# Altium PCB A4_USB.PcbDoc
Units mil, origin at the board's own origin, x right, y up, seen from the top; angles counter-clockwise.
Board outline 4763.78 x 2346.46 mil, 2 copper layers (Top Layer, Bottom Layer), stack 61.855 mil thick; 16 components, 33 nets, 94 pads, 65 vias.
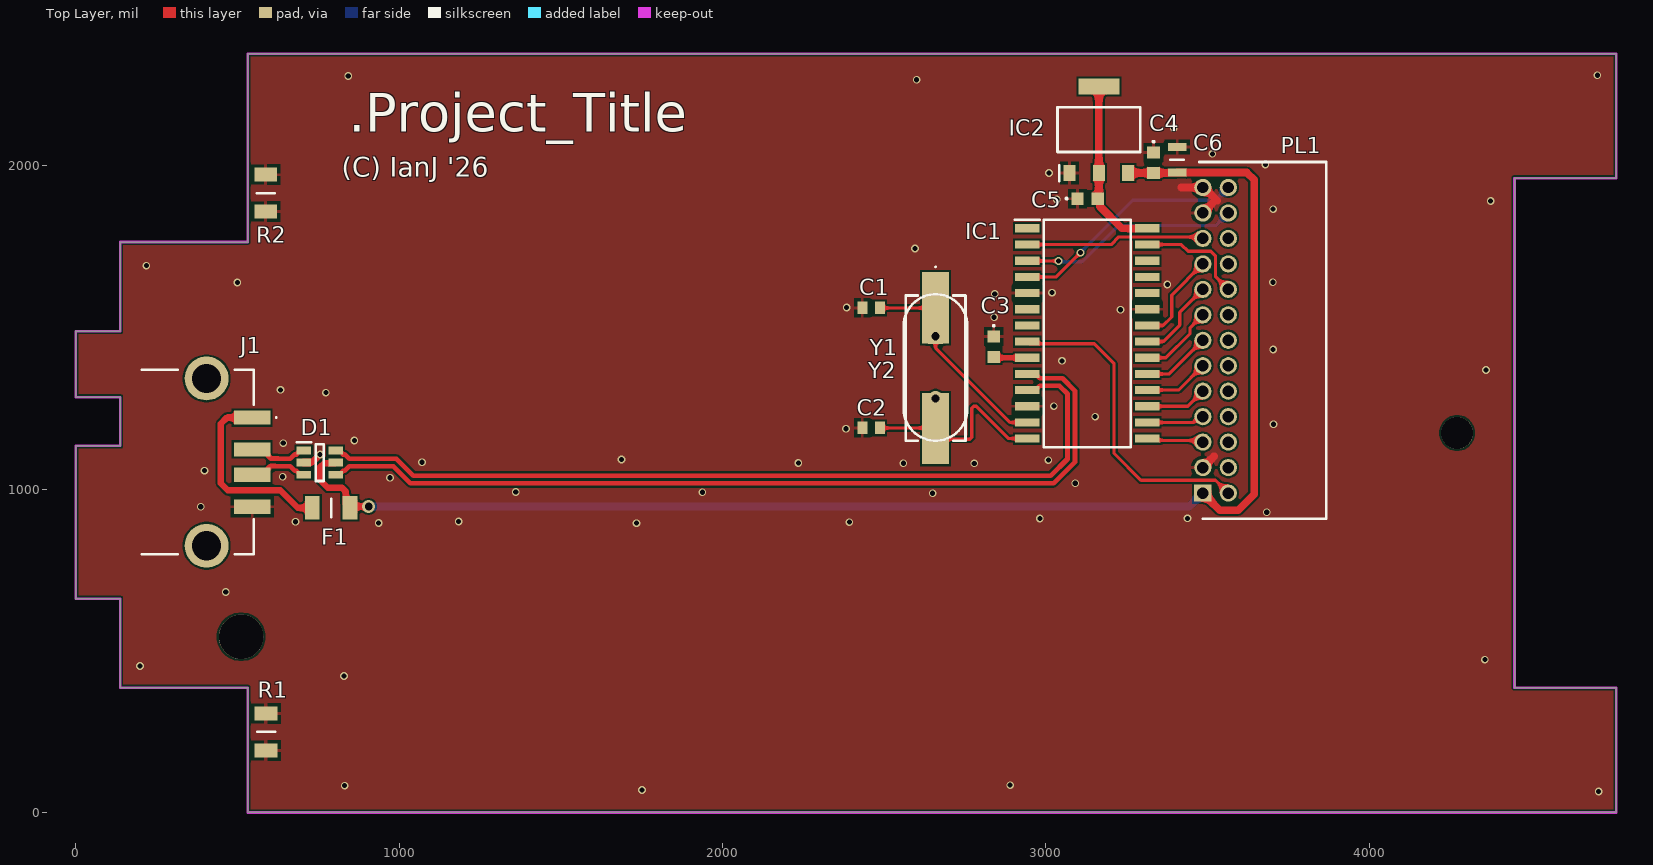
[diagram p0: Top Layer view]
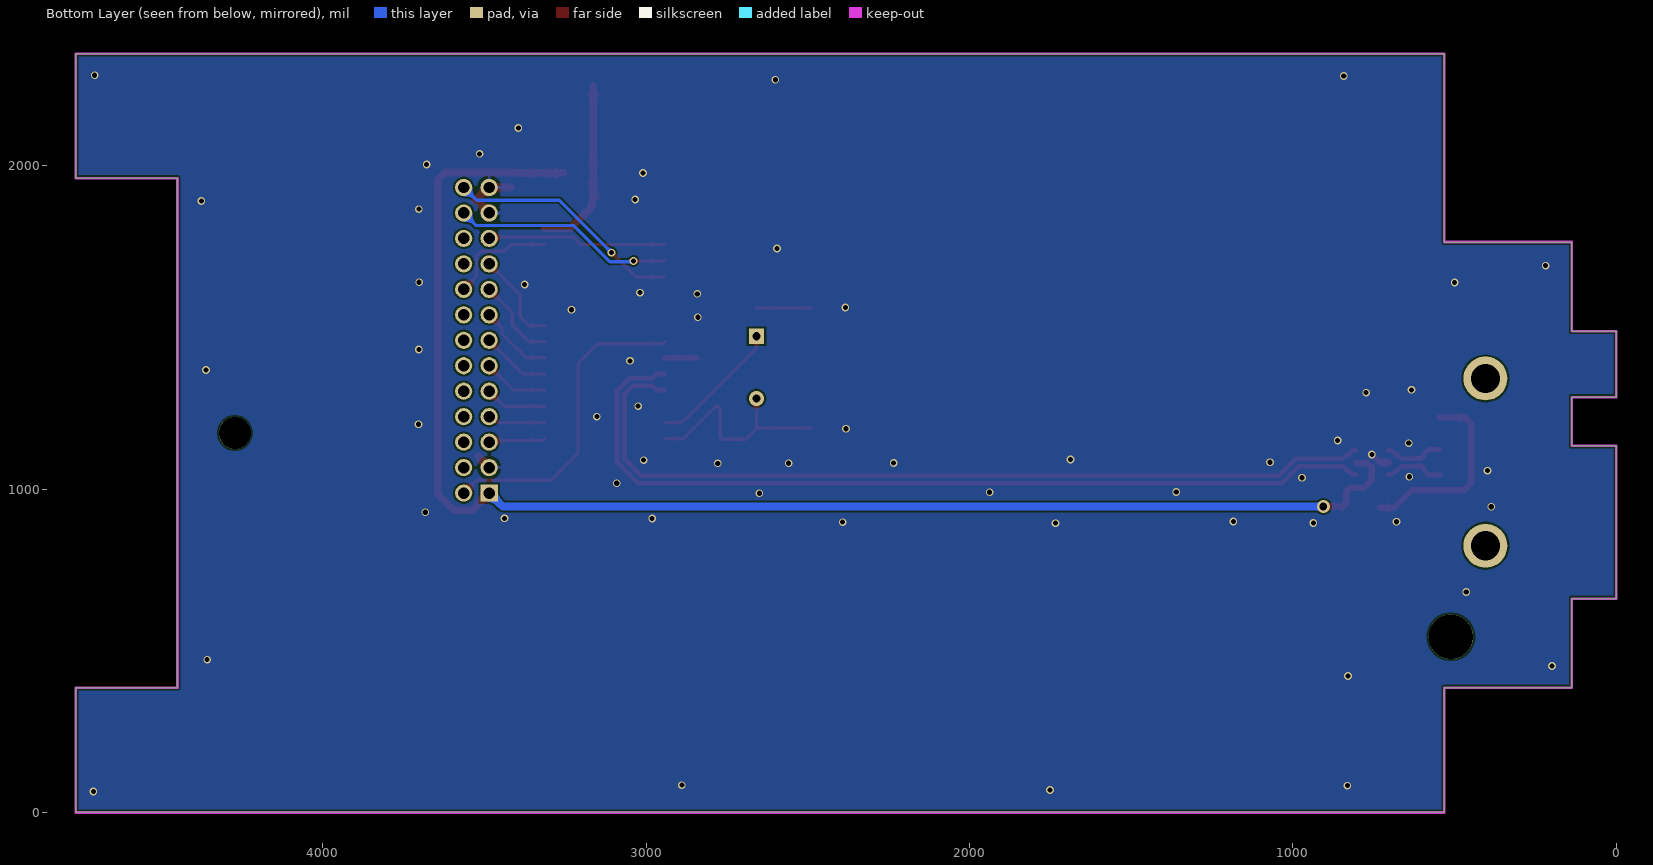
[diagram p1: Bottom Layer view, seen from below]
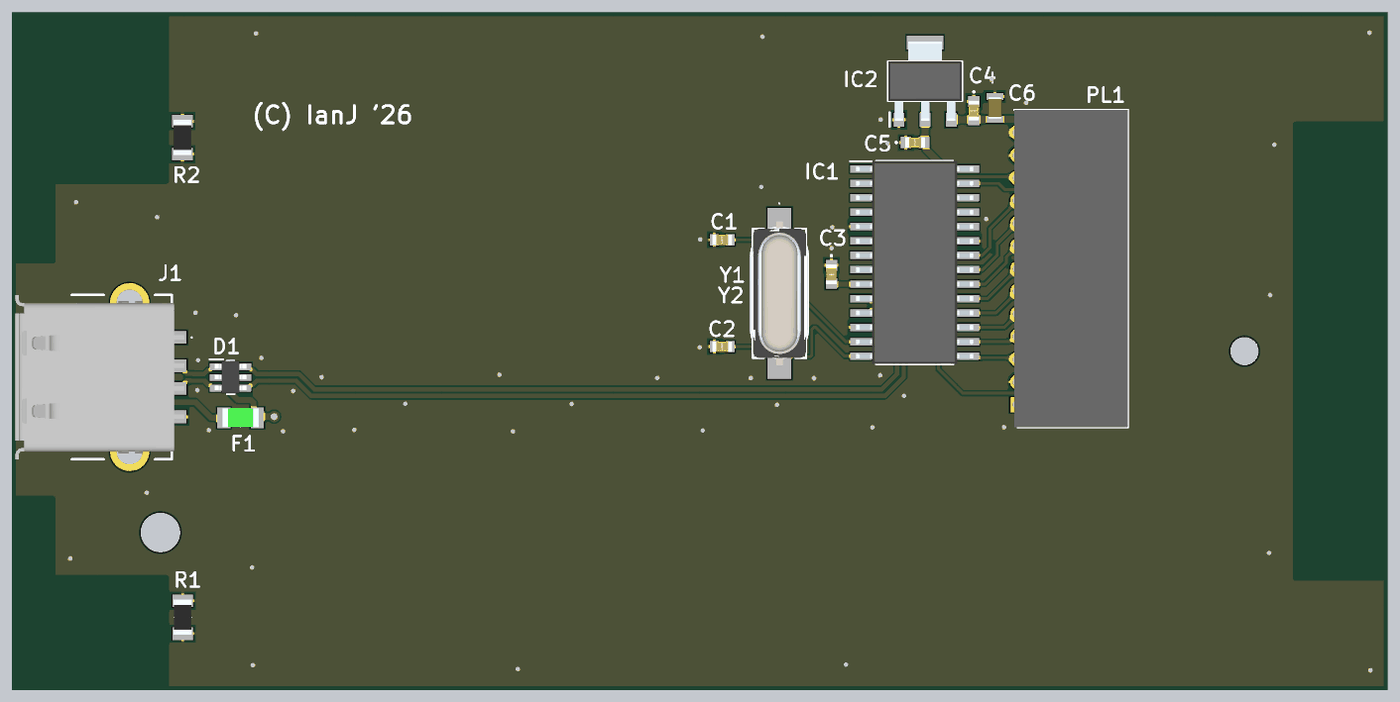
[diagram p2: 3D render of the assembled board from above, using the file's embedded part models]

## Layer stack, top to bottom
Top Solder: solder mask 0.4, Solder Resist, Dk 3.5
Top Layer: signal copper 1.4
FR4: dielectric 59.0551, FR-4, Dk 4.8
Bottom Layer: signal copper 1.4
Bottom Solder: solder mask 0.4, Solder Resist, Dk 3.5

## Board outline
138.17,385.83 138.17,661.42 0.37,661.42 0.37,1133.86 138.17,1133.86 138.17,1283.46 0.37,1283.46 0.37,1488.19 138.17,1488.19 138.17,1763.78 531.87,1763.78 531.87,2346.46 4764.15,2346.46 4764.15,1960.63 4449.19,1960.63 4449.19,385.83 4764.15,385.83 4764.15,0 531.87,0 531.87,385.83

## Design rules (kind name [scope] priority, off if disabled: settings)
Clearance [All] p1: gap=5.91 ignorepadtopadclearanceinfootprint=FALSE
DiffPairsRouting [All] p1: maxlimit=10 minlimit=8 mostfreqgap=8 toplayer_minwidth=12 toplayer_maxwidth=15 toplayer_prefwidth=12 bottomlayer_minwidth=12 bottomlayer_maxwidth=15 bottomlayer_prefwidth=12 maxuncoupledlength=500
HoleSize [All] p1: absolutevalues=TRUE maxlimit=157.48 minlimit=1 maxpercent=80.000 minpercent=20.000
MinimumSolderMaskSliver [All] p1: minsoldermaskwidth=1
PolygonConnect [All] p1: connectstyle=Relief reliefconductorwidth=10 reliefentries=4 polygonreliefangle="90 Angle" airgapwidth=10
RoutingVias [All] p1: holewidth=28 width=50 viastyle="Through Hole" minholewidth=15 minwidth=20 maxholewidth=28 maxwidth=50
SilkToSilkClearance [All] p1: silktosilkclearance=3.94
SilkToSolderMaskClearance [IsPad] p1: minsilkscreentomaskgap=3.94 clearancetoexposedcopper=TRUE
SolderMaskExpansion [All] p1: expansion=4 istentingtop=FALSE
SupplyNets "Schematic Supply Nets_6" [InNet('3V3')] p1: voltage=0.000
SupplyNets "Schematic Supply Nets_3" [InNet('GND')] p2: voltage=0.000
SupplyNets "Schematic Supply Nets" [InNet('5V')] p3: voltage=0.000
Width [All] p1: maxlimit=39.37 minlimit=10 preferedwidth=10
25 further rules are at their usual default settings.

## Classes and differential pairs
differential pair XUSBD: +XUSBD_P -XUSBD_N
differential pair USBD: +USBD_P -USBD_N

## Components (designator, comment, footprint, x,y, rotation, side; value= is the part's Value field where it differs from the comment)
C1 "22pF" CAPC1608X87N 2460,1560 r0 top
C2 "22pF" CAPC1608X87N 2460,1189 r0 top
C3 "10nF" C0603 2839,1440 r270 top
C4 "100nF" C0603 3333,2009 r270 top
C5 "100nF" C0603 3129,1898 r0 top
C6 "10uF" CAPC2012X145N 3406,2018 r270 top
D1 "82400102" SOT95P280X116-6N 755,1082 r0 top
F1 "SMD1206B050TF_15" FUSC3216X115N 790,942 r180 top
IC1 "CH376S" SOIC127P1032X264-28N 3128,1481 r0 top locked
IC2 "LM1117-3.3_MDC_NOPB" SOT230P700X180-4N 3164,2111 r90 top
J1 "87583-2010BLF" 875832010BLF 275.85,1083.28 r270 top locked
PL1 "DF11-26DP-2DS_52_" SHDRRA26W50P200_2X13_2800X1000X500P 3485.41,987.56 r270 top locked
R1 "Any 1206" RESC3116X65N 589,249 r270 top
R2 "Any 1206" RESC3116X65N 588,1915 r270 top
Y1 "12MHz" ABLS 2659,1374 r270 top
Y2 "12MHz" ABL 2659,1472 r270 top

## Footprints (in the part's own frame and the unit in brackets; to place one, negate y for a bottom-side part, rotate by r counter-clockwise, add the part's x,y. Pads: shape width x height; smd on the part's side, far side on the other; paste and mask are expansions set on the pad)
875832010BLF [mm]
  rect 1.12x2.88 smd: 1(-3.5,6.86) 2(-1,6.86) 3(1,6.86) 4(3.5,6.86)
  round 3.45 hole 2.3: MH1(-6.57,3.28) MH2(6.57,3.28)
  silkscreen extent -7.25,-1.82 7.25,8.8, body extent -7.25,-6.79 7.25,8.09, height 7.49
ABL [mm]
  rect 1.205x1.205 hole 0.657: 1(0,0)
  round 1.205 hole 0.657: 2(4.88,0)
  silkscreen extent -3.31,-2.5 8.19,2.5, body extent -3.31,-2.5 8.19,2.5, height 3.5
ABLS [mm]
  rect 5.6x2.1 smd: 1(-4.75,0) 2(4.75,0)
  silkscreen extent -8,-2.35 5.7,2.35, body extent -6.35,-2.35 6.35,2.35, height 4.2
C0603 [mm]
  rect 0.95x1 smd: 1(-0.8,0) 2(0.8,0)
  silkscreen extent -1.7,-0.05 -1.6,0.05, body extent -0.87,-0.48 0.88,0.47, height 0.87
CAPC1608X87N [mm]
  rect 0.78x0.98 smd: 1(-0.7,0) 2(0.7,0)
  body extent -0.87,-0.48 0.88,0.47, height 0.87
CAPC2012X145N [mm]
  rect 0.62x1.47 smd: 1(-1,0) 2(1,0)
  silkscreen extent 0,-0.53 0,0.53, body extent -1,-0.63 1,0.63, height 1.45
FUSC3216X115N [mm]
  rect 1.16x1.82 smd: 1(-1.475,0) 2(1.475,0)
  silkscreen extent 0,-0.72 0,0.72, body extent -1.6,-0.82 1.6,0.82, height 1.15
RESC3116X65N [mm]
  rect 1.1x1.8 smd: 1(-1.45,0) 2(1.45,0)
  silkscreen extent 0,-0.7 0,0.7, body extent -1.55,-0.8 1.55,0.8, height 0.65
SHDRRA26W50P200_2X13_2800X1000X500P [mm]
  rect 1.35x1.35 hole 0.9: 1(0,0)
  round 1.35 hole 0.9: 2(0,2) 3(-2,0) 4(-2,2) 5(-4,0) 6(-4,2) 7(-6,0) 8(-6,2) 9(-8,0) 10(-8,2) 11(-10,0) 12(-10,2) 13(-12,0) 14(-12,2) 15(-14,0) 16(-14,2) 17(-16,0) 18(-16,2) 19(-18,0) 20(-18,2) 21(-20,0) 22(-20,2) 23(-22,0) 24(-22,2) 25(-24,0) 26(-24,2)
  silkscreen extent -26,-0.3 2,9.7, body extent -26,-0.3 2,9.7, height 5
SOIC127P1032X264-28N [mm]
  rect 1.925x0.65 smd: 1(-4.712,8.255) 2(-4.712,6.985) 3(-4.712,5.715) 4(-4.712,4.445) 5(-4.712,3.175) 6(-4.712,1.905) 7(-4.712,0.635) 8(-4.712,-0.635) 9(-4.712,-1.905) 10(-4.712,-3.175) 11(-4.712,-4.445) 12(-4.712,-5.715) 13(-4.712,-6.985) 14(-4.712,-8.255) 15(4.712,-8.255) 16(4.712,-6.985) 17(4.712,-5.715) 18(4.712,-4.445) 19(4.712,-3.175) 20(4.712,-1.905) 21(4.712,-0.635) 22(4.712,0.635) 23(4.712,1.905) 24(4.712,3.175) 25(4.712,4.445) 26(4.712,5.715) 27(4.712,6.985) 28(4.712,8.255)
  silkscreen extent -5.68,-8.95 3.4,8.95, body extent -5.16,-8.95 5.16,8.95, height 2.64
SOT95P280X116-6N [mm]
  rect 1.15x0.6 smd: 1(-1.25,0.95) 2(-1.25,0) 3(-1.25,-0.95) 4(1.25,-0.95) 5(1.25,0) 6(1.25,0.95)
  silkscreen extent -1.83,-1.45 0.33,1.6, body extent -1.4,-1.42 1.4,1.48, height 1.16
SOT230P700X180-4N [mm]
  rect 1.25x0.95 smd: 1(-3.4,2.3) 2(-3.4,0) 3(-3.4,-2.3)
  rect 1.25x3.2 smd: 4(3.4,0)
  silkscreen extent -4.03,-3.25 1.75,3.25, body extent -3.5,-3.25 3.5,3.25, height 1.8

## Part data
C1 C2: library part C0603C220J1GACTU, "Capacitor", Manufacturer_Name="Yageo Group", Mouser Part Number=80-C0603C220J1G, Arrow Part Number=C0603C220J1GACTU, Arrow Price/Stock=https://www.arrow.com/en/products/c0603c220j1gactu/kemet-corporation, Datasheet Link=https://www.yageogroup.com/content/datasheet/asset/file/KEM_C1003_C0G_SMD, Height=0.87mm, Manufacturer_Part_Number=C0603C220J1GACTU, Mouser Price/Stock=https://www.mouser.co.uk/ProductDetail/KEMET/C0603C220J1GACTU?qs=HptsreX1S%2F74iVK3hnCGwA%3D%3D
C3: library part C0603C103K4RECTU, "Capacitor", Manufacturer_Name=KEMET, Mouser Part Number=80-C0603C103K4RECTU, Arrow Part Number=C0603C103K4RECTU, Arrow Price/Stock=https://www.arrow.com/en/products/c0603c103k4rectu/kemet-corporation?region=nac, Datasheet Link=https://content.kemet.com/datasheets/KEM_C1090_X7R_ESD.pdf, Height=0.87mm, Manufacturer_Part_Number=C0603C103K4RECTU, Mouser Price/Stock=https://www.mouser.co.uk/ProductDetail/KEMET/C0603C103K4RECTU?qs=55YtniHzbhDzGaFFpCm8vg%3D%3D
C4 C5: library part C0603C104Z4VAC7411, "Capacitor", Manufacturer_Name="Yageo Group", Mouser Part Number=80-C0603C104Z4VACLR, Datasheet Link=https://content.kemet.com/datasheets/KEM_C1005_Y5V_SMD.pdf, Height=0.87mm, Manufacturer_Part_Number=C0603C104Z4VAC7411, Mouser Price/Stock=https://www.mouser.co.uk/ProductDetail/KEMET/C0603C104Z4VAC7411?qs=t9q%2F2xDdjt%2FYD2OroS%2FhSQ%3D%3D
C6: library part GRM21BR61E106MA73L, "Capacitor", Manufacturer_Name="Murata Electronics", Mouser Part Number=81-GRM21BR61E106MA3L, Arrow Part Number=GRM21BR61E106MA73L, Arrow Price/Stock=https://www.arrow.com/en/products/grm21br61e106ma73l/murata-manufacturing?utm_currency=USD&region=nac, Datasheet Link=https://search.murata.co.jp/Ceramy/image/img/A01X/G101/ENG/GRM21BR61E106MA73-01A.pdf, Height=1.45mm, Manufacturer_Part_Number=GRM21BR61E106MA73L, Mouser Price/Stock=https://www.mouser.co.uk/ProductDetail/Murata-Electronics/GRM21BR61E106MA73L?qs=2W5sgKM%2F371odLMyCilkag%3D%3D
D1: "Diode", Manufacturer_Name="Wurth Elektronik", Mouser Part Number=710-82400102, Datasheet Link=https://www.we-online.com/catalog/datasheet/82400102.pdf, Height=1.16mm, Manufacturer_Part_Number=82400102, Mouser Price/Stock=https://www.mouser.co.uk/ProductDetail/Wurth-Elektronik/82400102?qs=Wn16VcyqZWq4x2NXBP4V%252Bw%3D%3D
F1: "Resettable Fuse", Arrow Part Number=SMD1206B050TF/15, Manufacturer_Name="Yageo Group", Mouser Part Number=603-SMD1206B050TF/15, Arrow Price/Stock=https://www.arrow.com/en/products/smd1206b050tf15/yageo?utm_currency=USD&region=nac, Datasheet Link=https://www.yageogroup.com/content/datasheet/asset/file/SMD1206_1, Height=1.15mm, Manufacturer_Part_Number=SMD1206B050TF/15, Mouser Price/Stock=https://www.mouser.co.uk/ProductDetail/YAGEO/SMD1206B050TF-15?qs=PzGy0jfpSMtHs3qJt7INeg%3D%3D
IC1: "Integrated Circuit", Manufacturer_Name="Microsemi Corporation", Datasheet Link=https://www.mpja.com/download/ch376ds1.pdf, Height=2.64mm, Manufacturer_Part_Number=CH376S
IC2: "Integrated Circuit", Manufacturer_Name="Texas Instruments", Manufacturer_Part_Number="LM1117-3.3 MDC/NOPB", Mouser Part Number=N/A, Datasheet Link=http://www.ti.com/lit/ds/symlink/lm1117.pdf?HQS=TI-null-null-mousermode-df-pf-null-wwe&DCM=yes&ref_url=https%3A%2F%2Fwww.mouser.in%2F&distId=26, Height=1.8mm, Mouser Price/Stock=https://www.mouser.co.uk/ProductDetail/Texas-Instruments/LM1117-3.3-MDC-NOPB?qs=Ek1QeT%2FBOW0pQDUjkXKTEQ%3D%3D
J1: "Connector", Manufacturer_Name="Amphenol Communications Solutions", Arrow Part Number=87583-2010BLF, Arrow Price/Stock=https://www.arrow.com/en/products/87583-2010blf/amphenol-fci?region=europe, Datasheet Link=https://cdn.amphenol-cs.com/media/wysiwyg/files/drawing/87583.pdf, Height=7.94mm, Manufacturer_Part_Number=87583-2010BLF
PL1: "Connector", Arrow Part Number=DF11-26DP-2DS(52), Manufacturer_Name=Hirose, Mouser Part Number=798-DF11-26DP-2DS52, Arrow Price/Stock=https://www.arrow.com/en/products/df11-26dp-2ds-52/hirose-electric, Datasheet Link=https://www.hirose.com/product/document?clcode=CL0543-0544-8-52&productname=DF11-26DP-2DS(52)&series=DF11&documenttype=2DDrawing&lang=en&documentid=0000995291, Height=5mm, Manufacturer_Part_Number=DF11-26DP-2DS(52), Mouser Price/Stock=https://www.mouser.co.uk/ProductDetail/Hirose-Connector/DF11-26DP-2DS52?qs=Ux3WWAnHpjAoQVMFZWdmwg%3D%3D
R1 R2: library part CR1206AJ_-000EAS, "Resistor", Arrow Part Number=CR1206AJ/-000EAS, Manufacturer_Name=Bourns, Mouser Part Number=652-CR1206AJ/-000EAS, Arrow Price/Stock=https://www.arrow.com/en/products/cr1206aj-000eas/bourns?region=nac, Datasheet Link=http://www.farnell.com/datasheets/2819381.pdf, Height=0.65mm, Manufacturer_Part_Number=CR1206AJ/-000EAS, Mouser Price/Stock=https://www.mouser.co.uk/ProductDetail/Bourns/CR1206AJ-000EAS?qs=PzGy0jfpSMutU5m6FlIuSA%3D%3D
Y1: library part ABLS-12.000MHZ-B2Y-T, "Crystal or Oscillator", Manufacturer_Name=ABRACON, Mouser Part Number=815-ABLS12000MHZB2YT, Datasheet Link=https://abracon.com/Resonators/abls.pdf, Manufacturer_Part_Number=ABLS-12.000MHZ-B2Y-T, Mouser Price/Stock=https://www.mouser.co.uk/ProductDetail/ABRACON/ABLS-12.000MHZ-B2Y-T?qs=vmHwEFxEFR%252BA%252B0BPn15RVQ%3D%3D
Y2: library part ABL-12.000MHZ-B2, "Crystal or Oscillator", Manufacturer_Name=ABRACON, Mouser Part Number=815-ABL-12-B2, Arrow Part Number=ABL-12.000MHZ-B2, Arrow Price/Stock=https://www.arrow.com/en/products/abl-12.000mhz-b2/abracon?region=nac, Datasheet Link=https://abracon.com/Resonators/ABL.pdf, Manufacturer_Part_Number=ABL-12.000MHZ-B2, Mouser Price/Stock=https://www.mouser.co.uk/ProductDetail/ABRACON/ABL-12.000MHZ-B2?qs=zLkLEWnxMJzcerUKP0J8Mw%3D%3D

## Free pads (board coordinates)
  round 137.8 hole 137.8 unplated: 7(511.81,543.31)
  round 98.43 hole 98.43 unplated: 8(4271.65,1173.23)

## Via types
v1: diameter 23.62, hole 15.75, Top Layer to Bottom Layer, tented both sides, 64 vias
v2: diameter 39.37, hole 23.62, Top Layer to Bottom Layer, tented both sides, 1 vias

## Nets (pads, with @x,y where several pads share a name; then routed paths per layer and width w, separated by ;. In a path a pad name is that pad's centre, name@x,y a point inside that pad or via, vN(x,y) a via of type N, cw(c..) or ccw(c..) an arc to the next point about the centre after c; other vN are vias at no path point)
3v3: C5.2 IC1.28 IC2.2 IC2.4 | length 556
  Top Layer w23.62: C5.2@3156,1902.5 3167.39,1891.11 3167.39,1873.61 3235,1806 IC1.28 ; C5.2 3164,1901.5 IC2.2 IC2.4
5V: C4.2 C6.2 D1.5 F1.1 IC2.3 PL1.1 | length 4476.3
  Top Layer w19.68: 775,1080 768.53,1080 757,1068.47 757,1027 780,1004 823.55,1004 835.08,992.47 835.08,954.99 F1.1 852.07,946 v2(906,946) ; 775.03,1080.03 802.24,1080.03 D1.5
  Top Layer w23.62: IC2.3@3254.91,1977.5 C4.2 3388.14,1977.5 3388.87,1978.24 C6.2@3404.87,1978.24 ; C6.2 3621.37,1978.63 3644,1956 3644,984 3595,935 3537.97,935 PL1.1
  Bottom Layer w23.62: v2@898.73,946 3443.85,946 PL1.1
/ECON: PL1.16
/EFIQ: PL1.22
/PIRQ: PL1.20
/PRE: IC1.4 PL1.26 | length 736.2
  Top Layer w10: IC1.4 3032,1656 v1(3107,1731)
  Bottom Layer w10: v1(3107,1731) 3268.62,1892.62 3524.33,1892.62 PL1.26
/PWE: IC1.3 PL1.24 | length 685.3
  Top Layer w10: IC1.3 2942.99,1705.5 3038.5,1705.5 v1(3039,1705)
  Bottom Layer w10: v1(3039,1705) 3041,1703 3112,1703 3223.6,1814.6 3525.05,1814.6 PL1.24
/RST: IC1.2 PL1.21 | length 554.7
  Top Layer w10: IC1.2 3202,1756 3225.7,1779.7 3480.67,1779.7 PL1.21
/S2: PL1.12
CLK2: PL1.14
CS: IC1.27 PL1.18 | length 345
  Top Layer w10: IC1.27 3419,1756 3439.93,1735.07 3509.76,1735.07 3524.84,1719.99 3524.84,1656.79 PL1.18
D0: IC1.15 PL1.5 | length 176.4
  Top Layer w10: IC1.15 3318.99,1150.52 3479.93,1150.52 PL1.5
D1: IC1.16 PL1.7 | length 179.3
  Top Layer w10: IC1.16 3455.95,1206 3473.73,1223.78 PL1.7
D2: IC1.17 PL1.9 | length 191.2
  Top Layer w10: IC1.17 3438.89,1256 PL1.9
D3: IC1.18 PL1.11 | length 203.1
  Top Layer w10: IC1.18 3410.15,1306 PL1.11
D4: IC1.19 PL1.13 | length 215
  Top Layer w10: IC1.19 3381.41,1356 PL1.13
D5: IC1.20 PL1.15 | length 237.6
  Top Layer w10: IC1.20 3371,1406 3446,1481 3446,1499.33 PL1.15
D6: IC1.21 PL1.17 | length 261.7
  Top Layer w10: IC1.21 3363,1456 3414,1507 3414,1546.07 PL1.17
D7: IC1.22 PL1.19 | length 290.4
  Top Layer w10: IC1.22 3363,1506 3389,1532 3389,1599.81 PL1.19
GND: C1.1 C2.1 C3.1 C4.1 C5.1 C6.1 D1.2 IC1.5 IC1.12 IC1.23 IC2.1 J1.4 PL1.3 PL1.23 PL1.25 R1.1 R1.2 R2.1 R2.2 | length 298
  Top Layer w19.68: D1.2@724,1082 729.93,1082 754.93,1107 v1(756,1107)
  Top Layer w23.62: D1.2 D1.2@724,1082 ; 3419,1933 3419.56,1932.44 PL1.25 3488.56,1932.44 3530,1891 3522.71,1891 PL1.23 ; PL1.3 3520,1100.89 3520,1101
  other v1: 4709,65 1751.32,69.47 832,83 2889.58,84.52 830,422 199,453 4357.32,472.47 464.38,681.79 937,895 1734.38,894.79 2392.38,897.79 680,899 1184.38,899.79 2981.38,908.79 3437.9,909.35 3682.9,928.35 386.9,945.35 2650,987 1938,990 1361,991 3091,1018 972,1035 640,1038 398.4,1056.85 2778.71,1079.41 2234.9,1080.35 2559.38,1079.79 1071,1083 3007.9,1089.35 1687.9,1091.35 642,1142 862,1150 2381.9,1186.35 3703.9,1200.35 3152.38,1223.79 3024.9,1256.35 774,1298 633.38,1306.79 4361,1368 3049.9,1396.35 3702.9,1431.35 2839.9,1531.35 3230.9,1554.35 2383.9,1561.35 2841.9,1603.35 3018.9,1607.35 3375.9,1632.35 500.38,1638.79 3701.9,1639.35 219,1691 2595.38,1743.79 3702.9,1865.35 4375.32,1890.47 3033.9,1895.35 3009.9,1977.35 3678.9,2003.35 3514.9,2036.35 3394.9,2116.35 2600.32,2265.47 843,2277 4705.32,2279.47
LA2: IC1.8 PL1.2 | length 978.5
  Top Layer w10: IC1.8 2949.49,1449 3150,1449 3211,1388 3211,1110 3293.81,1027.19 3524.52,1027.19 PL1.2
LA3: PL1.4
LA4: PL1.6
LA5: PL1.8
NetC1_2: C1.2 IC1.13 Y1.1 Y2.1 | length 586.6
  Top Layer w10: C1.2 2657.99,1560 Y1.1 ; Y2.1 2659,1436 2889,1206 IC1.13
NetC2_2: C2.2 IC1.14 Y1.2 Y2.2 | length 698.7
  Top Layer w10: C2.2 2656.99,1189 Y1.2 ; Y2.2 Y1.2 ; IC1.14 2885,1156 2785.14,1255.86 2776.86,1255.86 2771,1250 2771,1159.86 2765.14,1154 2691.99,1154 Y1.2
NetC3_2: C3.2 IC1.9 | length 104.5
  Top Layer w10: C3.2 C3.2@2841.5,1406
  Top Layer w15.75: C3.2@2841.5,1406 IC1.9
NetF1_2: F1.2 J1.1 | length 603.2
  Top Layer w19.68: J1.1 468.07,1221.07 449,1202 449,1018 471,996 633,996 687,942 F1.2
PR/W: PL1.10
USBD_N: D1.6 IC1.11 | length 2658.7
  Top Layer w15: D1.6 815.04,1119.4 827.22,1107.22 832.4,1107.22 846.12,1093.5 992.03,1093.5 1044.53,1041 3015,1041 3067,1093 3067,1294.47 3041.97,1319.5 2981.09,1319.5 2967.59,1306 IC1.11
USBD_P: D1.4 IC1.10 | length 2735
  Top Layer w15: D1.4 815.04,1044.6 827.22,1056.78 832.4,1056.78 846.12,1070.5 982.5,1070.5 1035,1018 3024.53,1018 3090,1083.47 3090,1304 3051.5,1342.5 2981.09,1342.5 2967.59,1356 IC1.10
XUSBD_N: D1.1 J1.2 | length 185.3
  Top Layer w15: J1.2 580.57,1122.65 595.12,1108.1 595.12,1103.56 603.91,1094.78 625.86,1094.78 627.14,1093.5 663.88,1093.5 677.6,1107.22 682.78,1107.22 694.96,1119.4 D1.1
XUSBD_P: D1.3 J1.3 | length 185.3
  Top Layer w15: J1.3 580.57,1043.91 595.12,1058.45 595.12,1062.99 603.91,1071.78 616.34,1071.78 617.61,1070.5 663.88,1070.5 677.6,1056.78 682.78,1056.78 694.96,1044.6 D1.3
pads on no net: IC1.1 IC1.6 IC1.7 IC1.24 IC1.25 IC1.26 J1.MH1 J1.MH2

## Polygon pours and split planes (outlines as drawn)
GND on Top Layer "GND_L01_P005" (solid, remove dead copper, pour order 5): 0.37,0 4764.15,0 4764.15,2346.46 0.37,2346.46
GND on Bottom Layer "GND_L02_P010" (solid, remove dead copper, pour order 10): 0,0 4764.15,0 4764.15,2346.46 0,2346.46

## Keep-outs
Keep-Out Layer:
  lines w8: 0,661 138,661 138,386 532,386 532,0 4764,0 4764,386 4449,386 4449,1961 4764,1961 4764,2346 532,2346 532,1764 138,1764 138,1488 0,1488 0,1284 138,1284 138,1134 0,1134 0,661

## Silkscreen, mask and mechanical layers (free items; w line width, h text height)
Top Overlay:
  text ".Project_Title" at 844.77,2105.06 h118.11
  text "(C) IanJ '26" at 823.28,1965.45 h60
Board Shape:
  lines w8: 0,661 138,661 138,386 532,386 532,0 4764,0 4764,386 4449,386 4449,1961 4764,1961 4764,2346 532,2346 532,1764 138,1764 138,1488 0,1488 0,1284 138,1284 138,1134 0,1134 0,661